# Altium PCB PCB_Button_Board_v2.0.PcbDoc (part 1 of 2)
Units mil, origin at the board's own origin, x right, y up, seen from the top; angles counter-clockwise.
Board outline 1338.58 x 1496.06 mil, 2 copper layers (Top Layer, Bottom Layer), stack 61.811 mil thick; 55 components, 38 nets, 175 pads, 83 vias.
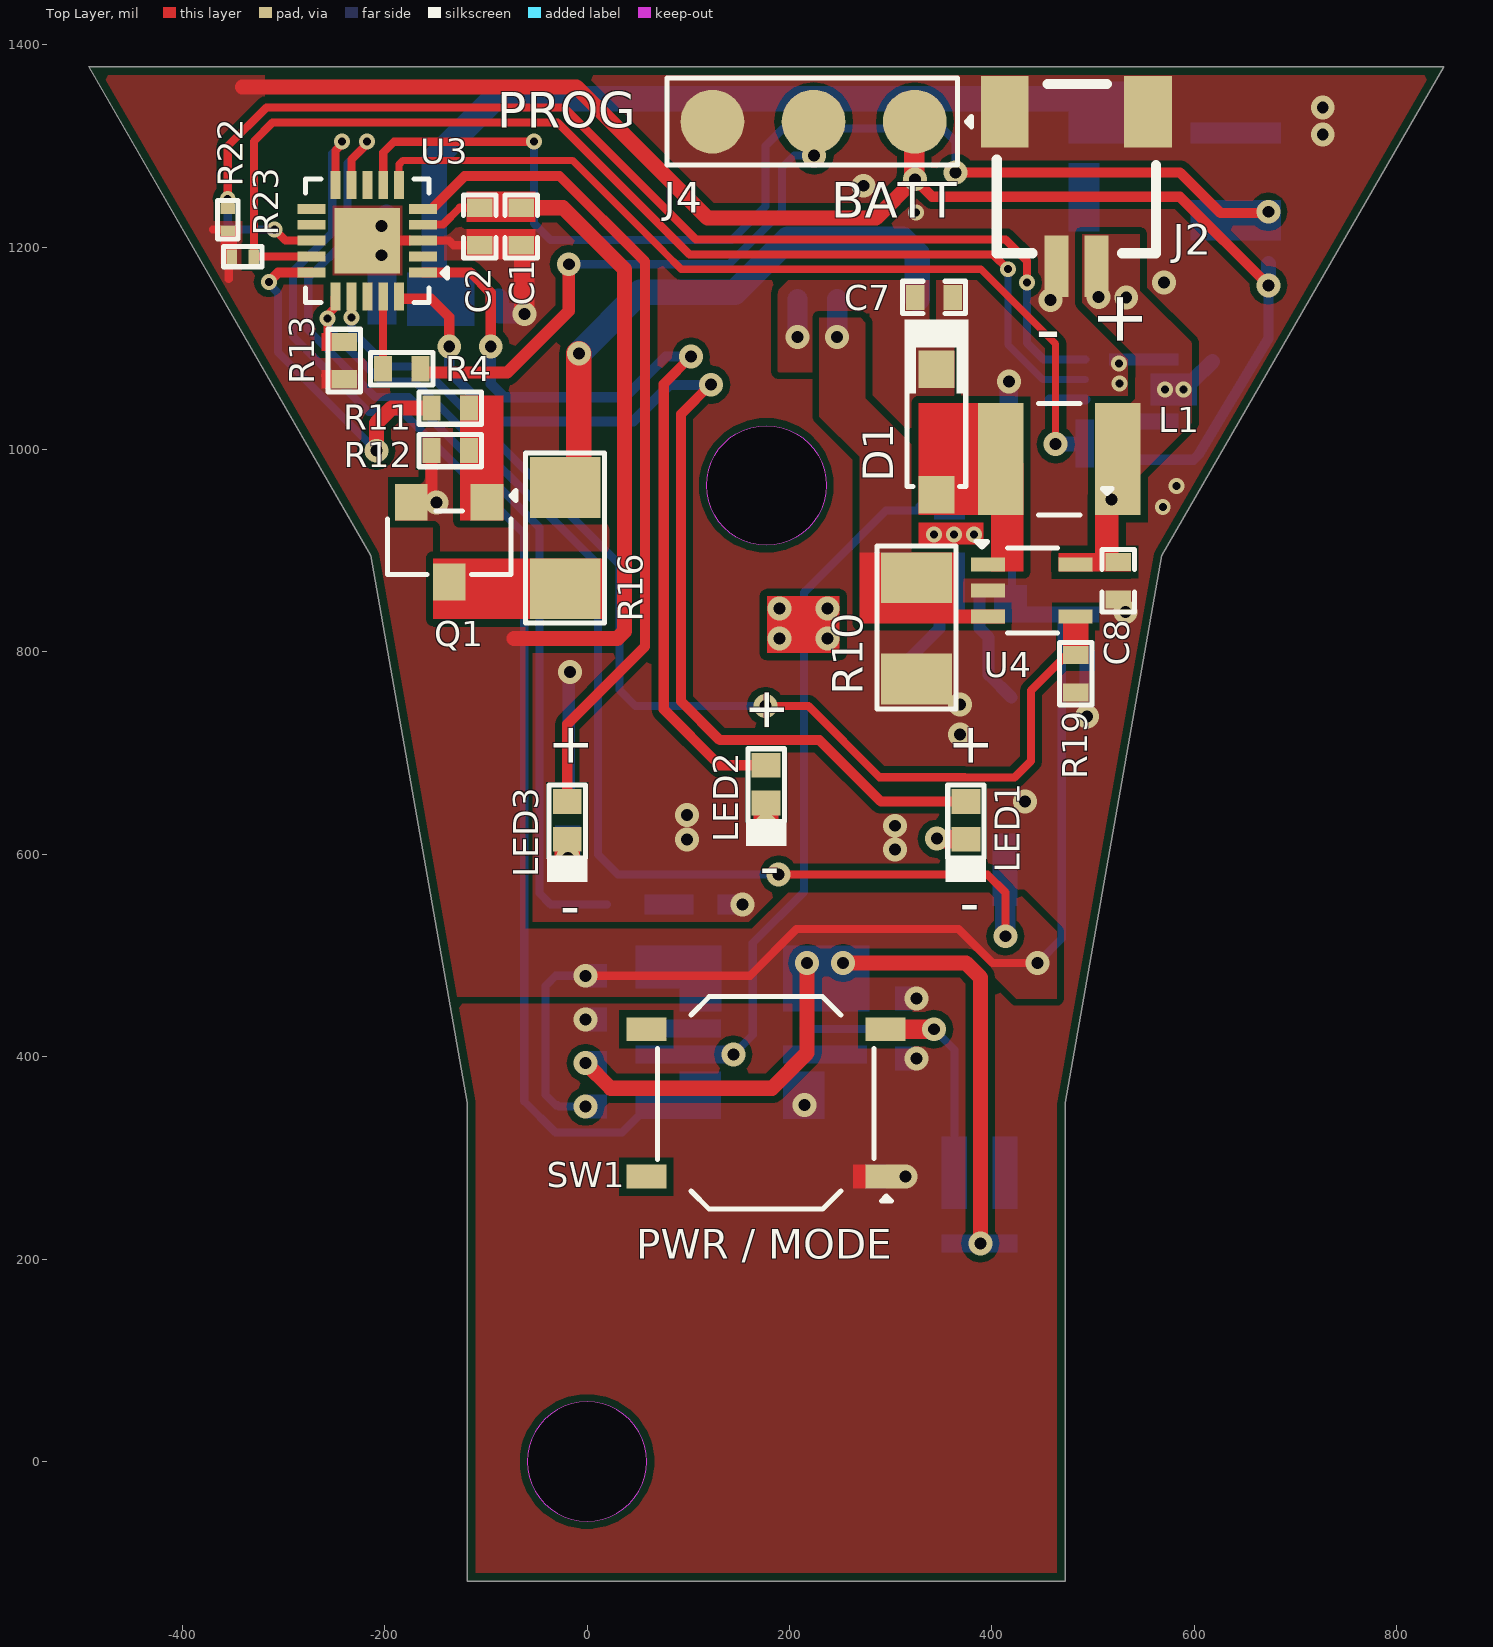
[diagram p0: Top Layer view]
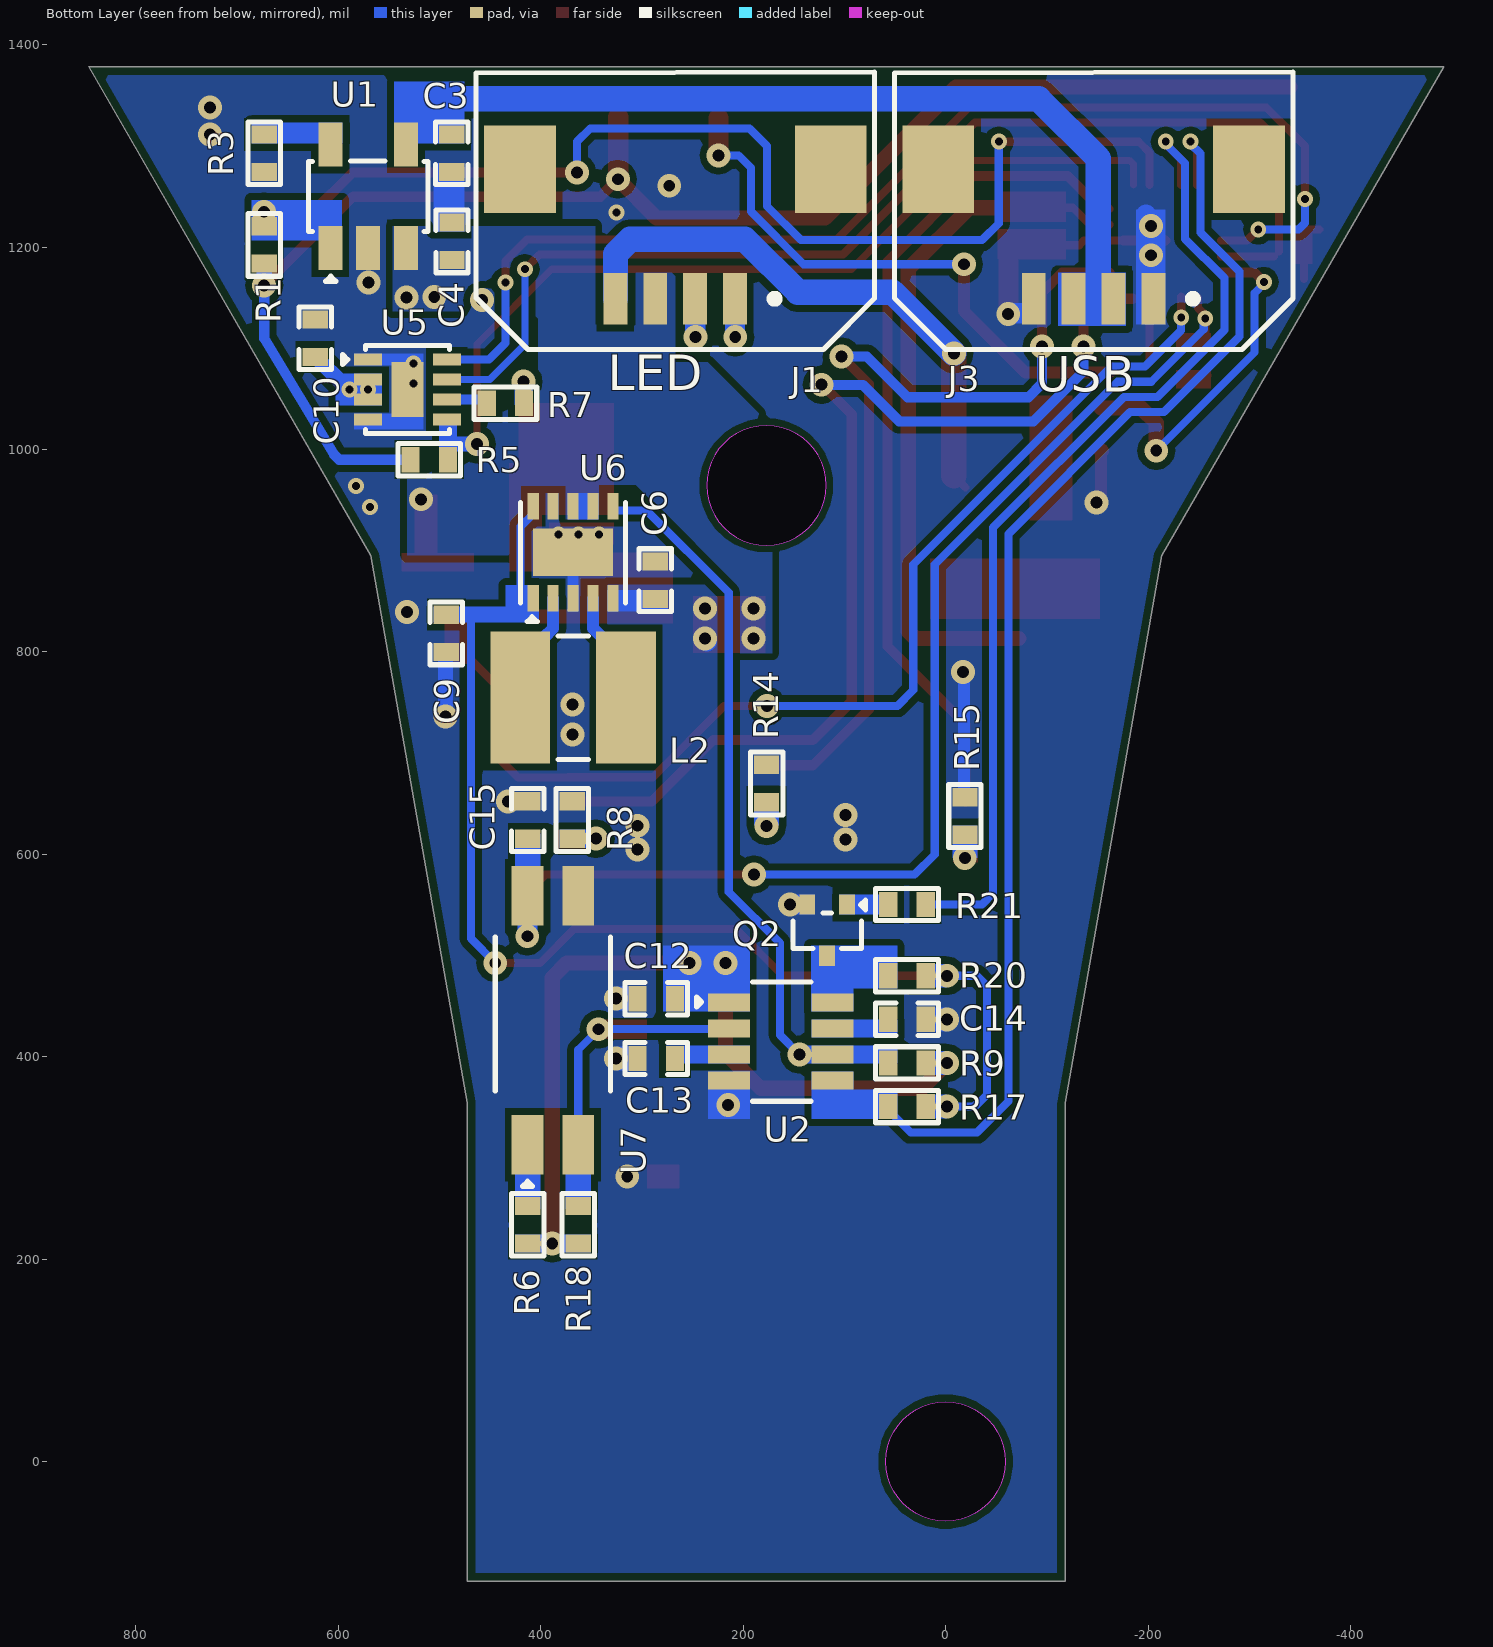
[diagram p1: Bottom Layer view, seen from below]
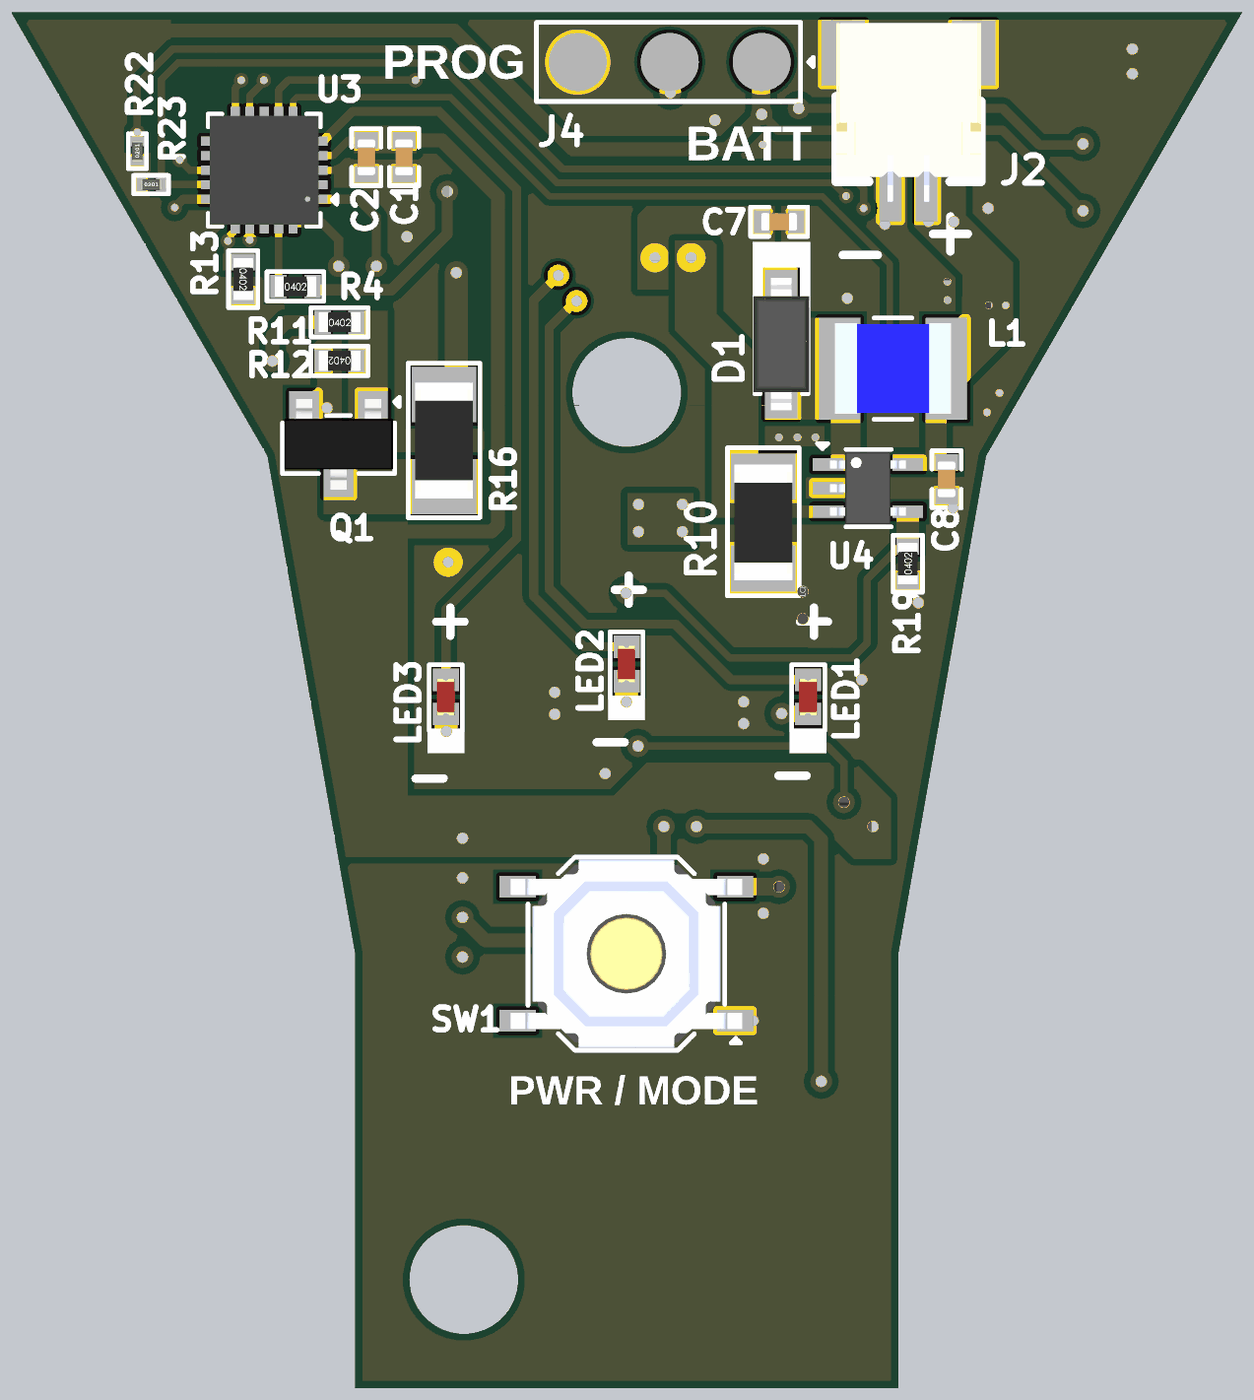
[diagram p2: 3D render of the assembled board from above, using the file's embedded part models]
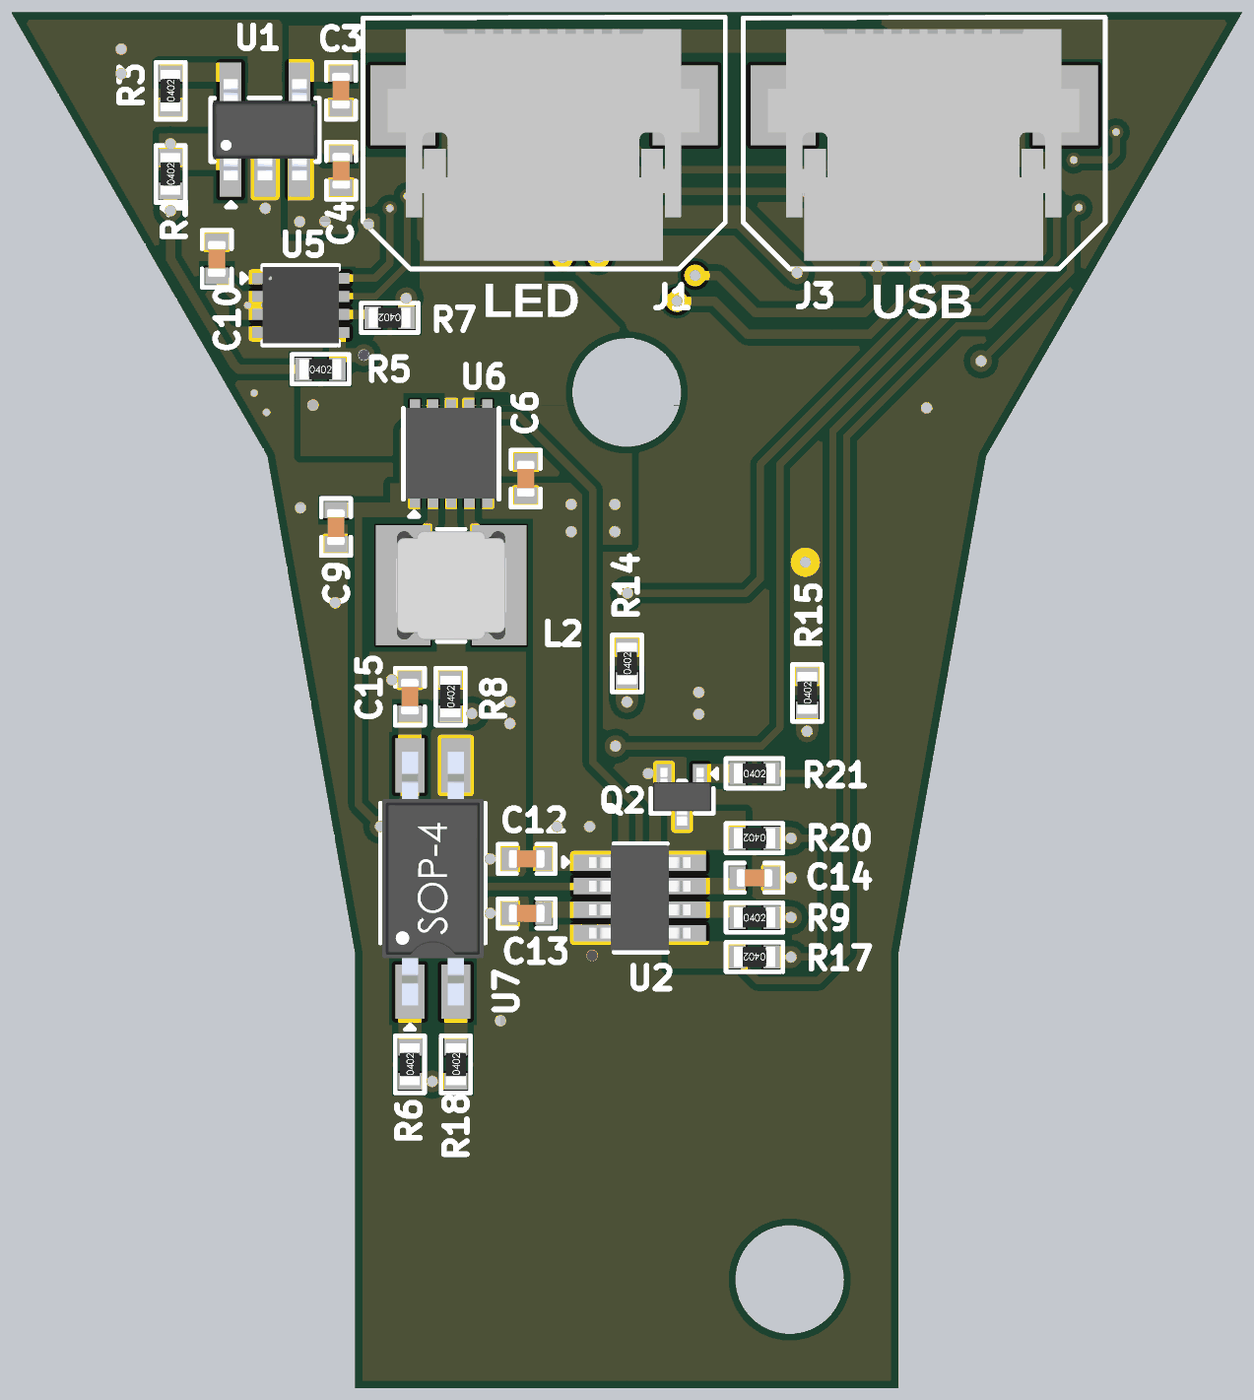
[diagram p3: 3D render of the assembled board from below, using the file's embedded part models]

## Layer stack, top to bottom
Top Solder: solder mask 0.3937, Solder Resist, Dk 3.5
Top Layer: signal copper 1.378
Dielectric 1: core 59.0551, FR-4, Dk 4.8
Bottom Layer: signal copper 1.378
Bottom Solder: solder mask 0.3937, Solder Resist, Dk 3.5

## Board outline
-118.11,-118.11 -118.11,354.33 -213.51,895.38 -492.13,1377.95 846.46,1377.95 567.84,895.38 472.44,354.33 472.44,-118.11
cut-out: -59.06,0 ccw(c0,0) 0,-59.06 ccw(c0,0) 59.06,0 ccw(c0,0) 0,59.06 ccw(c0,0)
cut-out: 177.17,905.51 cw(c177.17,964.57) 118.11,964.57 cw(c177.17,964.57) 177.17,1023.62 cw(c177.17,964.57) 236.22,964.57 cw(c177.17,964.57)

## Design rules (kind name [scope] priority, off if disabled: settings)
BoardOutlineClearance [All] p1: gap=0 ignorepadtopadclearanceinfootprint=FALSE except(8: Poly-OutlineEdge)
Clearance [All] p1: gap=7 ignorepadtopadclearanceinfootprint=FALSE except(4: Arc-SMDPad Track-SMDPad SMDPad-SMDPad; 5: SMDPad-Via)
HoleSize [All] p1: absolutevalues=TRUE maxlimit=1000 minlimit=1 maxpercent=80.000 minpercent=20.000
HoleToHoleClearance [All] p1: gap=2 allowstackedmicrovias=TRUE
MinimumSolderMaskSliver [All] p1: minsoldermaskwidth=0
PolygonConnect [All] p1: connectstyle=Direct reliefconductorwidth=10 reliefentries=4 polygonreliefangle="90 Angle" airgapwidth=10
RoutingVias [All] p1: holewidth=11.81 width=23.62 viastyle="Through Hole" minholewidth=7.87 minwidth=13.78 maxholewidth=11.81 maxwidth=23.62
SilkToSilkClearance [All] p1: silktosilkclearance=0
SilkToSolderMaskClearance [IsPad] p1: minsilkscreentomaskgap=0 clearancetoexposedcopper=TRUE
SolderMaskExpansion [All] p1: expansion=4
Width [All] p1: maxlimit=100 minlimit=7 preferedwidth=12 minimp=50.000000 maximp=50.000000 favimp=50.000000
25 further rules are at their usual default settings.

## Classes and differential pairs
component class U_Power-Sheet: C3 C4 C6 C9 C10 C12 C13 C14 L2 Q2 R1 R3 R5 R7 R9 R17 R20 R21 SW1 U1 U2 U5 U6
component class U_LED-Driver-Sheet: C7 C8 D1 L1 Q1 R10 R11 R12 R16 R19 U4
component class U_Controller-Sheet: C1 C2 C15 J4 LED1 LED2 LED3 R4 R6 R8 R13 R14 R15 R18 R22 R23 U3 U7
component class U_Connector-Sheet: J1 J2 J3

## Components (designator, comment, footprint, x,y, rotation, side; value= is the part's Value field where it differs from the comment)
C1 "1uF" Cap-0402 -64.97,1220.29 r90 top locked
C2 "0.1uF" Cap-0402 -105.97,1220.29 r90 top locked
C3 "4.7uF" Cap-0402 488.01,1292.66 r90 bottom
C4 "10uF" Cap-0402 487.73,1205.63 r270 bottom
C6 "10uF" Cap-0402 287.03,870.88 r90 bottom
C7 "4.7uF" Cap-0402 342.91,1150.23 r180 top
C8 "10uF" Cap-0402 525,870.2 r90 top
C9 "10uF" Cap-0402 493.37,818.26 r270 bottom
C10 "1uF" Cap-0402 622.98,1109.89 r270 bottom
C12 "1uF" Cap-0402 286,457.39 r180 bottom
C13 "680nF" Cap-0402 286,398.2 r180 bottom
C14 "680nF" Cap-0402 38.22,436.9 r0 bottom
C15 "0.1uF" Cap-0402 413,633.89 r270 bottom value=100nF
D1 "1N5819HW-7-F" SOD-123 345.26,1017.22 r90 top
J1 "XF3M(1)-0415-1B" XF3M(1)-0415-1B 267.07,1276.84 r0 bottom locked
J2 "SM02B-SRSS-TB(LF)(SN)" SM02B-SRSS-TB(LF)(SN) 483.58,1258.89 r180 top
J3 "XF3M(1)-0415-1B" XF3M(1)-0415-1B -146.3,1276.84 r0 bottom locked
J4 "3 Pin POGO" "3 Pin POGO" 223.89,1323.89 r180 top
L1 "4.7uH" IND-1210_ 466.71,990.47 r180 top
L2 "1.5uH" LVT303012-1R5M-N 368.11,754.83 r180 bottom
LED1 "XZVG68W-2" LED-0402 374.43,633.54 r270 top
LED2 "XZVG68W-2" LED-0402 176.95,669.29 r270 top
LED3 "XZVG68W-2" LED-0402 -19.57,633.54 r270 top
Q1 "FDN335N" SOT-23 -136.2,908.38 r180 top
Q2 "MMBT3904T-7-F" SOT-523 117,525 r0 bottom
R1 "10K" Res-0402 673.3,1202.13 r90 bottom
R3 "10K" Res-0402 673.3,1292.66 r90 bottom
R4 "4.7K" Res-0402 -183.11,1079.89 r0 top locked
R5 "10K" Res-0402 510.22,989.87 r180 bottom
R6 "470R" Res-0402 413,234 r90 bottom
R7 "10K" Res-0402 434.97,1045.79 r0 bottom
R8 "100R" Res-0402 368.89,633.89 r90 bottom
R9 "10K" Res-0402 38.22,393.8 r180 bottom
R10 "200mR" Res-1206#1 325.66,823.2 r90 top
R11 "1K" Res-0402 -135.11,1040.89 r0 top locked
R12 "10K" Res-0402 -135.11,998.89 r180 top locked
R13 "10K" Res-0402 -239.92,1087.78 r270 top
R14 "100R" Res-0402 176.89,669.89 r90 bottom locked
R15 "100R" Res-0402 -19.11,637.89 r90 bottom locked
R16 "5.6Ω" Res-1206#2 -21.57,912.37 r90 top
R17 "10K" Res-0402 38.22,350.76 r0 bottom
R18 "NC" Res-0402 363,234 r90 bottom
R19 "10K" Res-0402 482.79,778.43 r90 top
R20 "10K" Res-0402 38.22,480 r0 bottom
R21 "1K" Res-0402 38.22,550.39 r180 bottom
R22 "4.7K" Res-0201 -355,1226.96 r90 top
R23 "4.7K" Res-0201 -340.15,1190.54 r0 top
SW1 "TC-0522C-1.7-260G" TC-0522C-1.7-260G_ 176.77,354.29 r180 top value=-
U1 "TP4054" SOT-23-5 570.55,1250.18 r90 bottom
U2 "LTC2950CTS8-1#TRPBF" TSOT-23-8 163,415 r180 bottom
U3 "ATTINY1616-MNR" "20-VQFN (3x3)" -217.09,1206.29 r180 top locked
U4 "TPS92360DCKR" SC70-5 439.48,860.59 r0 top
U5 "MAX17048G+T10" "8-TDFN-EP (2x2)" 531.69,1059.25 r180 bottom
U6 "TPS63031DSKR" SON-10-EP(2.5x2.5) 368.11,898.37 r90 bottom
U7 "TCMT1107" "SOP-4-1.27mm pitch Body 2.6mm" 388,436 r90 bottom

## Footprints (in the part's own frame and the unit in brackets; to place one, negate y for a bottom-side part, rotate by r counter-clockwise, add the part's x,y. Pads: shape width x height; smd on the part's side, far side on the other; paste and mask are expansions set on the pad)
"3 Pin POGO" [mm] "Connector; Header; 3 Position"
  round 1.6 smd: 1(-2.54,0) 2(0,0) 3(2.54,0)
  silkscreen extent -3.96,-1.09 3.68,1.09
"8-TDFN-EP (2x2)" [mm]
  rect 0.7x0.3 smd: 1(-0.99,0.75) 2(-0.99,0.25) 3(-0.99,-0.25) 4(-0.99,-0.75) 5(0.99,-0.75) 6(0.99,-0.25) 7(0.99,0.25) 8(0.99,0.75)
  rect 0.8x1.38 smd: 9(0,0)
  silkscreen extent -1.63,-1.1 1.05,1.1, body extent -1.05,-1.05 1.05,1.05, height 0.81
"20-VQFN (3x3)" [mm]
  rect 0.7x0.25 smd: 1(-1.4,0.8) 2(-1.4,0.4) 3(-1.4,0) 4(-1.4,-0.4) 5(-1.4,-0.8) 11(1.4,-0.8) 12(1.4,-0.4) 13(1.4,0) 14(1.4,0.4) 15(1.4,0.8)
  rect 0.25x0.7 smd: 6(-0.8,-1.4) 7(-0.4,-1.4) 8(0,-1.4) 9(0.4,-1.4) 10(0.8,-1.4) 16(0.8,1.4) 17(0.4,1.4) 18(0,1.4) 19(-0.4,1.4) 20(-0.8,1.4)
  rect 1.65x1.65 smd: 21(0,0)
  silkscreen extent -2.01,-1.55 1.55,1.55, body extent -1.5,-1.5 1.5,1.5, height 0.59
Cap-0402 [mil]
  rect 18x25 smd mask+2.36: 1(-18.5,0) 2(18.5,0)
  silkscreen extent -31,-16 31,16, body extent -20,-10 20,10, height 19
IND-1210_ [mil]
  rect 45x110.63 smd: 1(-57.91,0) 2(57.91,0)
  silkscreen extent -20,-55 20,55, body extent -63,-49 63,49, height 47
LED-0402 [mm]
  rect 0.62x0.72 smd: 1(-0.475,0) 2(0.475,0)
  silkscreen extent -0.89,-0.51 1.55,0.51, body extent -0.5,-0.25 0.51,0.25, height 0.45
LVT303012-1R5M-N [mm]
  rect 1.5x3.32 smd paste+0 mask+0.051: 1(1.328,0) 2(-1.328,0)
  silkscreen extent -0.38,-1.55 0.38,1.55, body extent -1.51,-1.5 1.51,1.5, height 1.51
Res-0201 [mm]
  rect 0.27x0.37 smd mask+0.055: 1(-0.275,0) 2(0.275,0)
  silkscreen extent -0.48,-0.25 0.48,0.25, body extent -0.3,-0.15 0.3,0.15, height 0.29
Res-0402 [mil]
  rect 18x25 smd mask+2.17: 1(-18.5,0) 2(18.5,0)
  silkscreen extent -32,-17 32,16, body extent -23,-11 23,11, height 16
Res-1206#1 [mil]
  rect 50x70 smd: 1(-50,0) 2(50,0)
  silkscreen extent -80,-39 81,39, body extent -63,-31 63,31, height 24
Res-1206#2 [mil]
  rect 60x70 smd: 1(-50,0) 2(50,0)
  silkscreen extent -84,-39 84,39, body extent -63,-31 63,31, height 24
SC70-5 [mm]
  rect 0.85x0.35 smd: 1(-1.1,0.65) 2(-1.1,0) 3(-1.1,-0.65) 4(1.1,-0.65) 5(1.1,0.65)
  silkscreen extent -0.61,-1.07 0.64,1.07, body extent -1.05,-1 1.05,1, height 1.1
SM02B-SRSS-TB(LF)(SN) [mm]
  rect 0.6x1.55 smd: 1(-0.5,1.975) 2(0.5,1.975)
  rect 1.2x1.8 smd: 3(-1.8,-1.9) 4(1.8,-1.9)
  silkscreen extent -2,-2.6 2,1.65, body extent -2,-2.73 2,2.22, height 2.91
SOD-123 [mm]
  rect 0.95x0.9 smd: 1(-1.575,0) 2(1.575,0)
  silkscreen extent -1.37,-0.8 2.82,0.8, body extent -1.82,-0.78 1.83,0.78, height 1.5
SON-10-EP(2.5x2.5) [mm]
  rect 0.665x0.28 smd paste+0 mask+0.051: 1(-1.157,1) 2(-1.157,0.5) 3(-1.157,0) 4(-1.157,-0.5) 5(-1.157,-1) 6(1.157,-1) 7(1.157,-0.5) 8(1.157,0) 9(1.157,0.5) 10(1.157,1)
  rect 1.2x2 smd paste+0 mask+0.051: 11(0,0)
  silkscreen extent -1.74,-1.32 1.24,1.32, body extent -1.25,-1.25 1.25,1.25, height 0.8
"SOP-4-1.27mm pitch Body 2.6mm" [mm]
  rect 1.5x0.8 smd: 1(-3.125,0.635) 2(-3.125,-0.635) 3(3.125,-0.635) 4(3.125,0.635) 4(3.125,0.635)
  silkscreen extent -4.17,-1.45 2.08,1.45, body extent -3.5,-1.4 3.5,1.4, height 2.1
SOT-23 [mm] "TRANS NPN 40V 0.6A SOT23"
  rect 0.82x0.92 smd: 1(-0.95,-1) 2(0.95,-1) 3(0,1)
  silkscreen extent -1.68,-1.3 1.55,0.81, body extent -1.5,-1.25 1.5,1.25, height 1.05
SOT-23-5 [mm]
  rect 1.1x0.6 smd: 1(-1.3,0.95) 2(-1.3,0) 3(-1.3,-0.95) 4(1.3,-0.95) 5(1.3,0.95)
  silkscreen extent -2.13,-1.5 0.88,1.5, body extent -1.4,-1.45 1.4,1.45, height 1.45
SOT-523 [mm]
  rect 0.4x0.51 smd: 1(-0.5,-0.645) 2(0.5,-0.645) 3(0,0.645)
  silkscreen extent -0.97,-0.76 0.86,0.46, body extent -0.8,-0.8 0.8,0.8, height 0.8
TC-0522C-1.7-260G_ [mm]
  rect 1x0.6 smd: 1(-3,1.85) 2(3,1.85) 3(3,-1.85) 4(-3,-1.85)
  silkscreen extent -3.15,-2.67 2.72,2.67, body extent -3.2,-2.6 3.2,2.6, height 1.7
TSOT-23-8 [mm]
  rect 1.05x0.45 smd: 1(-1.3,0.975) 2(-1.3,0.325) 3(-1.3,-0.325) 4(-1.3,-0.975) 5(1.3,-0.975) 6(1.3,-0.325) 7(1.3,0.325) 8(1.3,0.975)
  silkscreen extent -2.11,-1.5 0.76,1.5, body extent -1.4,-1.45 1.4,1.45, height 1
XF3M(1)-0415-1B [mm]
  rect 0.6x1.3 smd: 1(1.503,3.25) 2(0.503,3.25) 3(-0.497,3.25) 4(-1.497,3.25)
  rect 1.8x2.2 smd: S1(3.9,0) S2(-3.9,0)
  silkscreen extent -5,-2.44 5,4.52, body extent -4.28,-2.1 4.32,4.3, height 1.97

## Part data
C1: library part GRM033R60J105MEA2D, "1 µF ±20% 6.3V Ceramic Capacitor X5R 0201 (0603 Metric)", Digikey Part Number=490-7229-6-ND, Manufacturer="Murata Electronics", Package=0201, ComponentLink1Description="Digikey Link", ComponentLink1URL=https://www.digikey.com/en/products/detail/murata-electronics/GRM033R60J105MEA2D/4213369, Item Type=Capacitor, Manufacturer Part Number=GRM033R60J105MEA2D
C2: library part GRM155R71C104KA88J, "0.1 µF ±10% 16V Ceramic Capacitor X7R 0402 (1005 Metric)", Digikey Part Number=490-6328-6-ND, Manufacturer="Murata Electronics", Package=0402, ComponentLink1Description="Digikey Link", ComponentLink1URL=https://www.digikey.com/en/products/detail/murata-electronics/GRM155R71C104KA88J/2610892, Item Type=Capacitor, Manufacturer Part Number=GRM155R71C104KA88J
C3 C7: library part CL05A475MO5NUNC, "CAP CER 4.7UF 16V X5R 0402", Case Code (Imperial)=0402, Case Code (Metric)=1005, Manufacturer=Samsung, Max Operating Temperature=85°C, Min Operating Temperature=-55°C, Tolerance=20%, Voltage Rating=16V, Capacitance=4.7uF, Case/Package=0402, Category="Ceramic Capacitors", ComponentLink1Description=http://www.farnell.com/datasheets/2710653.pdf?src-supplier=Farnell, ComponentLink1URL=http://www.farnell.com/datasheets/2710653.pdf?src-supplier=Farnell, ComponentLink2Description=http://www.samsungsem.com/kr/support/product-search/mlcc/CL05A475MO5NUNC.jsp?src-supplier=Digikey, ComponentLink2URL=http://www.samsungsem.com/kr/support/product-search/mlcc/CL05A475MO5NUNC.jsp?src-supplier=Digikey, ComponentLink3Description=http://www.farnell.com/datasheets/2710653.pdf?src-supplier=Element14, ComponentLink3URL=http://www.farnell.com/datasheets/2710653.pdf?src-supplier=Element14, ComponentLink4Description=https://datasheet.octopart.com/CL05A475MO5NUNC-Samsung-Electro-Mechanics-datasheet-123102911.pdf?src-supplier=Future+Electronics, ComponentLink4URL=https://datasheet.octopart.com/CL05A475MO5NUNC-Samsung-Electro-Mechanics-datasheet-123102911.pdf?src-supplier=Future+Electronics, ComponentLink5Description=http://www.farnell.com/datasheets/2710653.pdf?src-supplier=Newark, ComponentLink5URL=http://www.farnell.com/datasheets/2710653.pdf?src-supplier=Newark, Height=550um, Length=0.039inch, Manufacturer Part Number=CL05A475MO5NUNC, Material=4241ConductorMaterial, Mount="Surface Mount", Packaging="Cut Tape", Pricing 1="10000=0.09712 (USD)", RoHS=Yes, RoHS Compliant=Yes, Series=CL, Stock 1=50000, Supplier 1=Avnet, Supplier Part Number 1=CL05A475MO5NUNC, Thickness=0.022inch, Voltage Rating (DC)=16V, Width=0.02inch
C4 C6 C8 C9: library part CL05A106MP5NUNC, "CAP CER 10UF 10V X5R 0402", Case Code (Imperial)=0402, Case Code (Metric)=1005, Dielectric=X5R, LCSC Part Number=C315248, Manufacturer=Samsung, Max Operating Temperature=85°C, Min Operating Temperature=-55°C, Package Quantity=1, Tolerance=20%, Voltage Rating=10V, Capacitance=10uF, Case/Package=0402, Category="Ceramic Capacitors", ComponentLink1Description=https://datasheet.ciiva.com/25721/cl05a106mp5nunc-25721584.pdf?src-supplier=Digi-Key, ComponentLink1URL=https://datasheet.ciiva.com/25721/cl05a106mp5nunc-25721584.pdf?src-supplier=Digi-Key, ComponentLink2Description=https://datasheet.ciiva.com/26838/getdatasheetpartid-745310-26838170.pdf?src-supplier=Verical, ComponentLink2URL=https://datasheet.ciiva.com/26838/getdatasheetpartid-745310-26838170.pdf?src-supplier=Verical, Construction=Flat, Contact Plating=Tin, Depth=0.5mm, Item Type=Capacitor, Lead Free="Lead Free", Length=1mm, Manufacturer Part Number=CL05A106MP5NUNC, Mount="Surface Mount", Packaging="Tape and Reel", Pricing 1="10000=0.02537 (USD)", Radiation Hardening=No, RoHS=Yes, RoHS Compliant=Yes, Series=CL, Stock 1=1729850, Supplier 1=Avnet, Supplier Part Number 1=CL05A106MP5NUNC, Termination=Wraparound, Thickness=0.028inch, Width=0.02inch
C10: library part CC0402KRX5R7BB105, "CAP CER 1UF 16V X5R 0402", Case Code (Imperial)=0402, Case Code (Metric)=1005, Dielectric=X5R, LCSC Part Number=C325464, Manufacturer=Yageo, Max Operating Temperature=85°C, Min Operating Temperature=-55°C, Supplier Part Number 1=311-1691-6-ND, Tolerance=10%, Voltage Rating=16V, Capacitance=1uF, Case/Package=0402, ComponentLink1Description=http://www.yageo.com/documents/recent/UPY-GPHC_X5R_4V-to-50V_12.pdf?src-supplier=Avnet+Europe, ComponentLink1URL=http://www.yageo.com/documents/recent/UPY-GPHC_X5R_4V-to-50V_12.pdf?src-supplier=Avnet+Europe, Composition=Ceramic, Depth=0.5mm, Halogen Free="Halogen Free", Height=0.5mm, Item Type=Capacitor, Lead Free="Lead Free", Length=1mm, Manufacturer Part Number=CC0402KRX5R7BB105, Mount="Surface Mount", Packaging="Tape and Reel", Pricing 1="1=0.36, 10=0.252, 100=0.1512, 500=0.1134, 1000=0.09576, 2500=0.09072, 5000=0.08568 (USD)", Radiation Hardening=No, Stock 1=1405667, Supplier 1=Digi-Key, Termination=SMD/SMT, Thickness=0.022inch, Voltage Rating (DC)=16V, Weight=2.3E-05oz, Width=0.02inch
C12: library part GRM155R61E105KA12D, "CAP CER 1UF 25V X5R 0402", Case Code (Imperial)=0402, Case Code (Metric)=1005, Dielectric=X5R, LCSC Part Number=C77009, Manufacturer=Murata, Max Operating Temperature=85°C, Min Operating Temperature=-55°C, Package Quantity=10000, Supplier Part Number 1=490-10017-6-ND, Tolerance=10%, Voltage=25V, Capacitance=1uF, Case/Package=0402, ComponentLink1Description=http://www.farnell.com/datasheets/2048341.pdf?src-supplier=Element14, ComponentLink1URL=http://www.farnell.com/datasheets/2048341.pdf?src-supplier=Element14, Depth=0.5mm, Height=0.5mm, Lead Free="Lead Free", Length=1mm, Manufacturer Part Number=GRM155R61E105KA12D, Material=Ceramic, Mount="Surface Mount", Packaging="Tape and Reel", Pricing 1="1=0.11, 10=0.077, 100=0.0363, 500=0.02546, 1000=0.02108, 2500=0.01962, 5000=0.01795 (USD)", REACH SVHC="No SVHC", Stock 1=1150750, Supplier 1=Digi-Key, Termination=SMD/SMT, Thickness=0.022inch, Voltage Rating=25V, Voltage Rating (DC)=25V, Weight=0.000212oz, Width=0.5mm
C13 C14: library part CC0402KRX5R6BB684, "CAP CER 0.68UF 10V X5R 0402", LCSC Part Number=C113784, Manufacturer=Yageo, Temperature Coefficient=30ppm/°C, ComponentLink1Description=http://www.yageo.com/exep/pages/download/literatures/ProductSelectionGuide%202014_Final_2.pdf?src-supplier=Digikey, ComponentLink1URL=http://www.yageo.com/exep/pages/download/literatures/ProductSelectionGuide%202014_Final_2.pdf?src-supplier=Digikey, ComponentLink2Description=http://www.yageo.com/documents/recent/UPY-GPHC_X5R_4V-to-50V_25.pdf?src-supplier=Digikey, ComponentLink2URL=http://www.yageo.com/documents/recent/UPY-GPHC_X5R_4V-to-50V_25.pdf?src-supplier=Digikey, ComponentLink3Description=https://www.yageo.com/upload/media/product/productsearch/datasheet/mlcc/UPY-GPHC_X5R_4V-to-50V_26.pdf?src-supplier=Digikey, ComponentLink3URL=https://www.yageo.com/upload/media/product/productsearch/datasheet/mlcc/UPY-GPHC_X5R_4V-to-50V_26.pdf?src-supplier=Digikey, ComponentLink4Description=https://datasheet.octopart.com/CC0402KRX5R6BB684-Yageo-datasheet-86397281.pdf?src-supplier=Future+Electronics, ComponentLink4URL=https://datasheet.octopart.com/CC0402KRX5R6BB684-Yageo-datasheet-86397281.pdf?src-supplier=Future+Electronics, Height=550um, Item Type=Capacitor, Manufacturer Part Number=CC0402KRX5R6BB684, Material=4241ConductorMaterial, Pricing="1=0.12, 10=0.079, 50=0.0474, 100=0.0372, 500=0.0275, 1000=0.02277, 2500=0.0212, 5000=0.01939 (USD)", RoHS=Yes, Stock=42168, Supplier=Digikey
C15: library part GRM155R71C104KA88D, "CAP CER 0.1UF 16V X7R 0402", Case Code (Imperial)=0402, Case Code (Metric)=1005, Dielectric=X7R, Dielectric Material=Ceramic, Insulation Resistance=10GR, LCSC Part Number=C71629, Manufacturer=Murata, Max Operating Temperature=125°C, Min Operating Temperature=-55°C, Package Quantity=1, Tolerance=10%, Voltage=16V, Case/Package=0402, Category="Ceramic Capacitors", ComponentLink1Description=https://datasheet.ciiva.com/129/grm155r71c104ka88-01-129739.pdf?src-supplier=Digi-Key, ComponentLink1URL=https://datasheet.ciiva.com/129/grm155r71c104ka88-01-129739.pdf?src-supplier=Digi-Key, ComponentLink2Description=https://datasheet.ciiva.com/129/grm155r71c104ka88-01-129740.pdf?src-supplier=Digi-Key, ComponentLink2URL=https://datasheet.ciiva.com/129/grm155r71c104ka88-01-129740.pdf?src-supplier=Digi-Key, ComponentLink3Description=https://datasheet.ciiva.com/18102/getdatasheetpartid-85307-18102905.pdf?src-supplier=Verical, ComponentLink3URL=https://datasheet.ciiva.com/18102/getdatasheetpartid-85307-18102905.pdf?src-supplier=Verical, ComponentLink4Description=https://datasheet.ciiva.com/29199/454098-da-01-en-vs-kondensator-0402-29199799.pdf?src-supplier=Conrad, ComponentLink4URL=https://datasheet.ciiva.com/29199/454098-da-01-en-vs-kondensator-0402-29199799.pdf?src-supplier=Conrad, ComponentLink5Description=https://datasheet.ciiva.com/7937/4360-7937615.pdf?src-supplier=Element14, ComponentLink5URL=https://datasheet.ciiva.com/7937/4360-7937615.pdf?src-supplier=Element14, ComponentLink6Description=https://datasheet.ciiva.com/14116/grmseries-highdielectrictype-eng-14116878.pdf?src-supplier=Distrelec, ComponentLink6URL=https://datasheet.ciiva.com/14116/grmseries-highdielectrictype-eng-14116878.pdf?src-supplier=Distrelec, ComponentLink7Description=https://datasheet.ciiva.com/14103/grmseries-highdielectrictype-eng-14103750.pdf?src-supplier=Distrelec, ComponentLink7URL=https://datasheet.ciiva.com/14103/grmseries-highdielectrictype-eng-14103750.pdf?src-supplier=Distrelec, ComponentLink8Description=https://datasheet.ciiva.com/28534/4360-28534127.pdf?src-supplier=Element14, ComponentLink8URL=https://datasheet.ciiva.com/28534/4360-28534127.pdf?src-supplier=Element14, ComponentLink9Description=https://datasheet.ciiva.com/28534/4360-28534133.pdf?src-supplier=Element14, ComponentLink9URL=https://datasheet.ciiva.com/28534/4360-28534133.pdf?src-supplier=Element14, ComponentLink10Description=https://datasheet.ciiva.com/16199/product-16199000.pdf?src-supplier=Future+Electronics, ComponentLink10URL=https://datasheet.ciiva.com/16199/product-16199000.pdf?src-supplier=Future+Electronics, Depth=0.5mm, Height=0.5mm, Item Type=Capacitor, Lead Free="Lead Free", Length=1mm, Manufacturer Part Number=GRM155R71C104KA88D, Material=Ceramic, Mounting Technology="Surface Mount", Packaging="Tape and Reel", Pins=2, Pricing 1="10000=0.00480, 30000=0.00470, 100000=0.00350, 250000=0.00330 (USD)", Radiation Hardening=No, RoHS=Yes, RoHS Compliant=Yes, Series=GRM, Stock 1=1690322, Supplier 1="Arrow Electronics", Supplier Part Number 1=GRM155R71C104KA88D, Termination=SMD/SMT, Thickness=0.022inch, Voltage Rating=16V, Voltage Rating (DC)=16V, Width=0.02inch
D1: "DIODE SCHOTTKY 40V 1A SOD123", Average Rectified Current=1A, Capacitance=110pF, Case/Package=SOD-123-2, Forward Voltage=450mV, LCSC Part Number=C82544, Manufacturer=Diodes, Max Forward Surge Current (Ifsm)=25A, Max Operating Temperature=125°C, Max Power Dissipation=450mW, Max Repetitive Reverse Voltage (Vrrm)=40V, Max Reverse Current=50uA, Min Operating Temperature=-65°C, Package Quantity=3000, Supplier Part Number 1=1N5819HW-FDICT-ND, Category="Schottky Diodes", ComponentLink1Description=https://datasheet.ciiva.com/16303/ds30217-16303296.pdf?src-supplier=Future+Electronics, ComponentLink1URL=https://datasheet.ciiva.com/16303/ds30217-16303296.pdf?src-supplier=Future+Electronics, ComponentLink2Description=https://datasheet.ciiva.com/27092/1538419-27092484.pdf?src-supplier=Jameco, ComponentLink2URL=https://datasheet.ciiva.com/27092/1538419-27092484.pdf?src-supplier=Jameco, ComponentLink3Description=https://datasheet.ciiva.com/912/ds30217-912801.pdf?src-supplier=Digi-Key, ComponentLink3URL=https://datasheet.ciiva.com/912/ds30217-912801.pdf?src-supplier=Digi-Key, ComponentLink4Description=https://datasheet.ciiva.com/1177/ds30217-1177089.pdf?src-supplier=Element14, ComponentLink4URL=https://datasheet.ciiva.com/1177/ds30217-1177089.pdf?src-supplier=Element14, ComponentLink5Description=https://datasheet.ciiva.com/912/ds30217-912802.pdf?src-supplier=Digi-Key, ComponentLink5URL=https://datasheet.ciiva.com/912/ds30217-912802.pdf?src-supplier=Digi-Key, ComponentLink6Description=https://datasheet.ciiva.com/912/ds30217-912803.pdf?src-supplier=Digi-Key, ComponentLink6URL=https://datasheet.ciiva.com/912/ds30217-912803.pdf?src-supplier=Digi-Key, ComponentLink7Description=https://datasheet.ciiva.com/8303/ds30217-8303132.pdf?src-supplier=Avnet, ComponentLink7URL=https://datasheet.ciiva.com/8303/ds30217-8303132.pdf?src-supplier=Avnet, ComponentLink8Description=https://datasheet.ciiva.com/25919/ds30217-25919644.pdf?src-supplier=Avnet+Europe, ComponentLink8URL=https://datasheet.ciiva.com/25919/ds30217-25919644.pdf?src-supplier=Avnet+Europe, Contact Plating=Tin,Matte, Current Rating=1A, Element Configuration=Single, Forward Current=1A, Height=1.25mm, Item Type=Diode, Lead Free="Lead Free", Length=2.85mm, Manufacturer Part Number=1N5819HW-7-F, Max Reverse Voltage (DC)=40V, Number of Pins=2, Output Current=1A, Packaging="Tape and Reel", Peak Non-Repetitive Surge Current=25A, Polarity=Standard, Pricing 1="1=0.46000, 10=0.34500, 100=0.19530, 500=0.12936, 1000=0.09918 (USD)", Radiation Hardening=No, REACH SVHC="No SVHC", RoHS=Yes, RoHS Compliant=Yes, Series=-, Supplier 1=Digi-Key, Termination=SMD/SMT, Voltage Rating (DC)=40V, Weight=0.000353oz, Width=1.7mm
J1 J3: "4 Position FFC, FPC Connector Contacts, Top and Bottom 0.039\" (1.00mm) Surface Mount, Right Angle", Digikey Part Number=OR1210CT-ND, Manufacturer="Omron Electronics Inc-EMC Div", Package="1mm FPC", ComponentLink1Description="Digikey Link", ComponentLink1URL=https://www.digikey.com/en/products/detail/omron-electronics-inc-emc-div/XF3M-1-0415-1B/4695932, Item Type=FPC-1mm, Manufacturer Part Number=XF3M(1)-0415-1B
J2: "Connector Header Surface Mount, Right Angle 2 position 0.039 _1.00mm_", Digikey Part Number=455-SM02B-SRSS-TBDKR-ND, Manufacturer="JST Sales", Manufacturer Part Number=SM02B-SRSS-TB_LF__SN_, Package=None, Availability=Unavailable, ComponentLink1Description="Digikey Link", ComponentLink1URL=https://www.digikey.com/en/products/detail/jst-sales-america-inc/SM02B-SRSS-TB/926708?s=N4IgTCBcDaIMoFkAMYBCBaOAlOd0BVUQBdAXyA, Price=None, SnapEDA_Link=https://www.snapeda.com/parts/SM02B-SRSS-TB%28LF%29%28SN%29/JST%20Sales%20America%20Inc./view-part/447499/?ref=snap
J4: library part 68000-103HLF, "CONN HEADER VERT 3POS 2.54MM", Current Rating=3A, Digikey Part Number=609-3461-ND, Flammability Rating="UL94 V-0", Housing Color=Black, Insulation Resistance=5GR, LCSC Part Number=C168677, Max Operating Temperature=125°C, Max Voltage Rating (AC)=1.5kV, Min Operating Temperature=-65°C, Package Quantity=100, Supplier Part Number=88K1775, Category="Headers and Wire Housings", ComponentLink1Description=LCSC, ComponentLink2Description=https://datasheet.ciiva.com/46392/1914865-46392021.pdf?src-supplier=Element14, ComponentLink2URL=https://datasheet.ciiva.com/46392/1914865-46392021.pdf?src-supplier=Element14, ComponentLink3Description="Digikey Link", ComponentLink3URL=https://www.digikey.com/en/products/detail/amphenol-cs-fci/68000-103HLF/2023309?s=N4IgTCBcDaIGwA4AMKC0BGJBmAEgGQDEQBdAXyA, Contact Gender=Male, Contact Material=Bronze, Contact Mating Length=5.84mm, Contact Plating=Gold,GXT, Contact Post Length=2.41mm, Depth=2.41mm, Housing Material=Thermoplastic, Item Type="Male Header", Length=7.62mm, Manufacturer Part Number=68000-103HLF, Number of Contacts=3, Number of Positions=3, Number of Rows=1, Orientation=Straight, Packaging=Bulk, Pitch=2.54mm, Pricing="1=0.395, 10=0.31, 25=0.29, 50=0.27, 100=0.25 (USD)", Radiation Hardening=No, Reach SVHC Compliant=No, RoHS=No, Series=68000, Stock=2805, Supplier=Avnet, Termination="Through Hole", Voltage Rating=1.5kV
L1: library part DFE322512F-4R7M=P2, "FIXED IND 4.7UH 1.6A 157MOHM SMD", LCSC Part Number=C703083, Manufacturer=Murata, Manufacturer Part Number=DFE322512F-4R7M=P2, Supplier Part Number 1=490-DFE322512F-4R7M=P2CT-ND, Category="Fixed Inductors", Item Type=Inductor, Pricing 1="1=0.61, 10=0.533, 25=0.4952, 50=0.4188, 100=0.3808, 250=0.35792, 500=0.31984, 1000=0.25892 (USD)", RoHS=Yes, RoHS Compliant=Yes, Stock 1=4687, Supplier 1=Digi-Key
L2: library part LVT303012-1R5M-N, "2.34A 1.5uH Shielded Power Inductors ±20% SMD Power Inductors ROHS", LCSC Part Number=C280560, Manufacturer="Chilisin Elec", Package=SMD, ComponentLink1Description=LCSC, ComponentLink1URL=https://www.lcsc.com/product-detail/Power-Inductors_Chilisin-Elec-LVT303012-1R5M-N_C280560.html, Item Type=Inductor, Manufacturer Part Number=LVT303012-1R5M-N
LED1 LED2 LED3: "LED GREEN CLEAR CHIP SMD", Case Code (Imperial)=0402, Case Code (Metric)=1005, Color=Green, Forward Voltage=2.1V, Lens Color=Colorless, Manufacturer=SunLED, Supplier Part Number 1=1497-1219-6-ND, Test Current=20mA, Case/Package=0402, ComponentLink1Description=http://www.sunledusa.com/products/spec/XZVG68W-2.pdf?src-supplier=Digi-Key, ComponentLink1URL=http://www.sunledusa.com/products/spec/XZVG68W-2.pdf?src-supplier=Digi-Key, ComponentLink2Description=https://www.sunledusa.com/products/spec/XZVG68W-2.pdf?src-supplier=Digi-Key, ComponentLink2URL=https://www.sunledusa.com/products/spec/XZVG68W-2.pdf?src-supplier=Digi-Key, Dominant Wavelength=570nm, Height=0.6mm, Item Type=LED, Length=1mm, Lens Transparency=Clear, Luminous Intensity=49mcd, Manufacturer Part Number=XZVG68W-2, Mount="Surface Mount", Packaging="Tape and Reel", Pricing 1="1=0.5, 10=0.36, 100=0.16, 500=0.112, 1000=0.092 (USD)", Stock 1=4185, Supplier 1=Digi-Key, Viewing Angle=120°, Width=0.5mm
Q1: "SOT-23 MOSFETs ROHS", Digikey Part Number=FDN335NDKR-ND, Manufacturer=onsemi, Package=SOT-23, ComponentLink1Description="Digikey Link", ComponentLink1URL=https://www.digikey.com/en/products/detail/onsemi/FDN335N/965301, Item Type=Mosfet, Manufacturer Part Number=FDN335N
Q2: "TRANS NPN 40V 0.2A SOT523", LCSC Part Number=C239187, Manufacturer="Diodes Zetex", Supplier Part Number=4140292, Category=BJTs, ComponentLink1Description=https://datasheet.ciiva.com/15139/getdatasheetpartid-142850-15139485.pdf?src-supplier=Verical, ComponentLink1URL=https://datasheet.ciiva.com/15139/getdatasheetpartid-142850-15139485.pdf?src-supplier=Verical, ComponentLink2Description=https://datasheet.ciiva.com/11199/ds30270-11199009.pdf?src-supplier=Avnet, ComponentLink2URL=https://datasheet.ciiva.com/11199/ds30270-11199009.pdf?src-supplier=Avnet, ComponentLink3Description=https://datasheet.ciiva.com/17053/0900766b80e49818-17053736.pdf?src-supplier=Allied+Electronics, ComponentLink3URL=https://datasheet.ciiva.com/17053/0900766b80e49818-17053736.pdf?src-supplier=Allied+Electronics, ComponentLink4Description=https://datasheet.ciiva.com/8029/ds30270-8029717.pdf?src-supplier=Element14, ComponentLink4URL=https://datasheet.ciiva.com/8029/ds30270-8029717.pdf?src-supplier=Element14, ComponentLink5Description=https://datasheet.ciiva.com/22711/480146-22711751.pdf?src-supplier=Element14, ComponentLink5URL=https://datasheet.ciiva.com/22711/480146-22711751.pdf?src-supplier=Element14, ComponentLink6Description=https://datasheet.ciiva.com/4723/ds30270-4723401.pdf?src-supplier=Mouser, ComponentLink6URL=https://datasheet.ciiva.com/4723/ds30270-4723401.pdf?src-supplier=Mouser, ComponentLink7Description=https://datasheet.ciiva.com/6360/ds30270-6360919.pdf?src-supplier=Digikey, ComponentLink7URL=https://datasheet.ciiva.com/6360/ds30270-6360919.pdf?src-supplier=Digikey, Item Type=Transistor, Manufacturer Part Number=MMBT3904T-7-F, Pricing="3000=0.0261, 9000=0.0252, 15000=0.0248, 60000=0.0236, 90000=0.0229 (USD)", RoHS=Yes, Stock=36000, Supplier="Future Electronics"
R1 R12: library part RC0603FR-0710KL, "10 kOhms ±1% 0.063W, 1/16W Chip Resistor 0402 (1005 Metric) Moisture Resistant Thick Film", Digikey Part Number=311-10.0KLRDKR-ND, Manufacturer=YAGEO, Manufacturer Part Number=RC0402FR-0710KL, Package=0402, ComponentLink1Description="Digikey Link", ComponentLink1URL=https://www.digikey.com/en/products/detail/yageo/RC0402FR-0710KL/726523, Item Type=Resistor
R3 R5 R7 R9 R13 R17 R20: library part RC0402FR-0710KL, "RES 10K OHM 1% 1/16W 0402", Case Code (Imperial)=0402, Case Code (Metric)=1005, LCSC Part Number=C60490, Manufacturer=Yageo, Max Operating Temperature=155°C, Max Power Dissipation=63mW, Min Operating Temperature=-55°C, Power Rating=62.5mW, Resistance=10kR, Resistance Tolerance=1%, Resistor Type="Thick Film", Supplier Part Number 1=603-RC0402FR-0710KL, Temperature Coefficient=100ppm/°C, Voltage Rating=50V, Case/Package=0402, Category="Chip SMD Resistors", ComponentLink1Description=https://datasheet.ciiva.com/7660/38568-7660787.pdf?src-supplier=Element14, ComponentLink1URL=https://datasheet.ciiva.com/7660/38568-7660787.pdf?src-supplier=Element14, ComponentLink2Description=https://datasheet.ciiva.com/7849/1686128-7849814.pdf?src-supplier=Element14, ComponentLink2URL=https://datasheet.ciiva.com/7849/1686128-7849814.pdf?src-supplier=Element14, ComponentLink3Description=https://datasheet.ciiva.com/7983/1018594-7983486.pdf?src-supplier=Element14, ComponentLink3URL=https://datasheet.ciiva.com/7983/1018594-7983486.pdf?src-supplier=Element14, ComponentLink4Description=https://datasheet.ciiva.com/22747/1018594-22747512.pdf?src-supplier=Element14, ComponentLink4URL=https://datasheet.ciiva.com/22747/1018594-22747512.pdf?src-supplier=Element14, ComponentLink5Description=https://datasheet.ciiva.com/12667/pyu-rc0402-51-rohs-l-6-r-12667067.pdf?src-supplier=Mouser, ComponentLink5URL=https://datasheet.ciiva.com/12667/pyu-rc0402-51-rohs-l-6-r-12667067.pdf?src-supplier=Mouser, ComponentLink6Description=https://datasheet.ciiva.com/7849/1784430-7849813.pdf?src-supplier=Element14, ComponentLink6URL=https://datasheet.ciiva.com/7849/1784430-7849813.pdf?src-supplier=Element14, ComponentLink7Description=https://datasheet.ciiva.com/7849/1784430-7849815.pdf?src-supplier=Element14, ComponentLink7URL=https://datasheet.ciiva.com/7849/1784430-7849815.pdf?src-supplier=Element14, Construction=Rectangular, Depth=0.5mm, Features="Moisture Resistant", Height=0.32mm, Item Type=Resistor, Lead Free="Lead Free", Lead Pitch=0.2mm, Length=1mm, Manufacturer Part Number=RC0402FR-0710KL, Military Standard=Not, Number of Pins=2, Number of Terminations=2, Packaging="Tape and Reel", Pricing 1="1=0.10000, 10=0.01400, 50=0.01400, 100=0.00500, 1000=0.00300, 10000=0.00200 (USD)", REACH SVHC="No SVHC", RoHS=Yes, RoHS Compliant=Yes, Series=RC, Stock 1=18648329, Supplier 1=Mouser, Termination=SMD/SMT, Tolerance=1%, Voltage Rating (DC)=50V, Width=0.5mm, Working Voltage=50V
R4: library part RC0402FR-074K7L, "4.7 kOhms ±1% 0.063W, 1/16W Chip Resistor 0402 (1005 Metric) Moisture Resistant Thick Film", Digikey Part Number=311-4.7KLRDKR-ND, Manufacturer=YAGEO, Package=0402, ComponentLink1Description="Digikey Link", ComponentLink1URL=https://www.digikey.com/en/products/detail/yageo/RC0402FR-074K7L/2827563, Item Type=Resistor, Manufacturer Part Number=RC0402FR-074K7L
R6: library part RC0402FR-07470RL, "RES 470 OHM 1% 1/16W 0402", Case Code (Imperial)=0402, Case Code (Metric)=1005, LCSC Part Number=C114877, Manufacturer=Yageo, Max Operating Temperature=155°C, Max Power Dissipation=63mW, Min Operating Temperature=-55°C, Package Quantity=1, Power Rating=62.5mW, Resistance Tolerance=1%, Resistor Type="Thick Film", Temperature Coefficient=100ppm/°C, Voltage Rating=50V, Case/Package=0402, ComponentLink1Description=https://datasheet.ciiva.com/46412/1018594-46412838.pdf?src-supplier=Element14, ComponentLink1URL=https://datasheet.ciiva.com/46412/1018594-46412838.pdf?src-supplier=Element14, ComponentLink2Description=https://datasheet.ciiva.com/2453/pyu-r-int-thick-7-2453377.pdf?src-supplier=Digikey, ComponentLink2URL=https://datasheet.ciiva.com/2453/pyu-r-int-thick-7-2453377.pdf?src-supplier=Digikey, ComponentLink3Description=https://datasheet.ciiva.com/2453/pyu-r-int-thick-7-2453378.pdf?src-supplier=Digikey, ComponentLink3URL=https://datasheet.ciiva.com/2453/pyu-r-int-thick-7-2453378.pdf?src-supplier=Digikey, ComponentLink4Description=https://datasheet.ciiva.com/2453/pyu-r-int-thick-7-2453376.pdf?src-supplier=Digikey, ComponentLink4URL=https://datasheet.ciiva.com/2453/pyu-r-int-thick-7-2453376.pdf?src-supplier=Digikey, ComponentLink5Description=https://datasheet.ciiva.com/7850/1018594-7850015.pdf?src-supplier=Element14, ComponentLink5URL=https://datasheet.ciiva.com/7850/1018594-7850015.pdf?src-supplier=Element14, ComponentLink6Description=https://datasheet.ciiva.com/7850/1018594-7850014.pdf?src-supplier=Element14, ComponentLink6URL=https://datasheet.ciiva.com/7850/1018594-7850014.pdf?src-supplier=Element14, ComponentLink7Description=https://datasheet.ciiva.com/15189/getdatasheetpartid-330246-15189463.pdf?src-supplier=Verical, ComponentLink7URL=https://datasheet.ciiva.com/15189/getdatasheetpartid-330246-15189463.pdf?src-supplier=Verical, Construction=Rectangular, Depth=0.5mm, Features="Moisture Resistant", Height=0.016inch, Item Type=Resistor, Lead Free="Lead Free", Length=1mm, Manufacturer Part Number=RC0402FR-07470RL, Military Standard=Not, Number of Terminations=2, Packaging="Tape and Reel", Pricing="10000=0.00085 (USD)", Reach SVHC Compliant=No, RoHS=Yes, RoHS Compliant=Yes, Series=RC, Stock=10000, Supplier=Avnet, Supplier Part Number=RC0402FR-07470RL, Termination=SMD/SMT, Tolerance=1%, Voltage Rating (AC)=50V, Width=0.02inch, Working Voltage=50V
R8 R14 R15: library part RC0402FR-07100RL, "100 Ohms ±1% 0.063W, 1/16W Chip Resistor 0402 (1005 Metric) Moisture Resistant Thick Film", Digikey Part Number=311-100LRDKR-ND, Manufacturer=YAGEO, Package=0402, ComponentLink1Description="Digikey Link", ComponentLink1URL=https://www.digikey.com/en/products/detail/yageo/RC0402FR-07100RL/726527, Item Type=Resistor, Manufacturer Part Number=RC0402FR-07100RL
R10: library part PE1206FRF470R2L, "RES 0.2 OHM 1% 1W 1206", Case/Package=340Case, LCSC Part Number=C723709, Manufacturer=Yageo, Temperature Coefficient=100ppm/°C, Item Type=Resistors, Manufacturer Part Number=PE1206FRF470R2L, Packaging=10Packaging, Pricing="1=0.63, 10=0.459, 25=0.368, 50=0.2732, 100=0.1927, 250=0.17164, 500=0.14714, 1000=0.1121 (USD)", RoHS=Yes, RoHS Compliant=Yes, Stock=7734, Supplier=Digikey
R11: library part RC0402FR-071KL, "1 kOhms ±1% 0.063W, 1/16W Chip Resistor 0402 (1005 Metric) Moisture Resistant Thick Film", Digikey Part Number=311-1.00KLRDKR-ND, Manufacturer=YAGEO, Package=0402, ComponentLink1Description="Digikey Link", ComponentLink1URL=https://www.digikey.com/en/products/detail/yageo/RC0402FR-071KL/726513, Item Type=Resistor, Manufacturer Part Number=RC0402FR-071KL
R16: library part RC1206FR-075R6L, "RES 5.6 OHM 1% 1/4W 1206", LCSC Part Number=C137246, Manufacturer=Yageo, Voltage Rating (AC)=200V, ComponentLink1Description=https://datasheet.ciiva.com/11808/0900766b80c6630a-11808968.pdf?src-supplier=Rs, ComponentLink1URL=https://datasheet.ciiva.com/11808/0900766b80c6630a-11808968.pdf?src-supplier=Rs, ComponentLink2Description=https://datasheet.ciiva.com/7857/444357-7857382.pdf?src-supplier=Element14, ComponentLink2URL=https://datasheet.ciiva.com/7857/444357-7857382.pdf?src-supplier=Element14, ComponentLink3Description=https://datasheet.ciiva.com/7857/444357-7857383.pdf?src-supplier=Element14, ComponentLink3URL=https://datasheet.ciiva.com/7857/444357-7857383.pdf?src-supplier=Element14, ComponentLink4Description=https://datasheet.ciiva.com/17422/pyu-rc1206-51-rohs-l-4-17422485.pdf?src-supplier=Future+Electronics, ComponentLink4URL=https://datasheet.ciiva.com/17422/pyu-rc1206-51-rohs-l-4-17422485.pdf?src-supplier=Future+Electronics, Item Type=Resistor, Manufacturer Part Number=RC1206FR-075R6L, Pricing="5000=0.0109, 25000=0.0104, 100000=0.0098, 250000=0.0095, 625000=0.009 (USD)", RoHS=Yes, Stock=50000, Supplier="Future Electronics"
R18 R19: library part RT0402BRD0710KL, "RES SMD 10K OHM 0.1% 1/16W 0402", LCSC Part Number=C190095, Manufacturer=Yageo, Supplier Part Number=1236728, Category="Chip SMD Resistors", ComponentLink1Description=https://datasheet.ciiva.com/12836/pyu-rt-1-to-0-05-rohs-l-4-12836454.pdf?src-supplier=Mouser, ComponentLink1URL=https://datasheet.ciiva.com/12836/pyu-rt-1-to-0-05-rohs-l-4-12836454.pdf?src-supplier=Mouser, Item Type=Resistor, Manufacturer Part Number=RT0402BRD0710KL, Pricing="10000=0.0218, 20000=0.0213, 30000=0.021, 50000=0.0206, 100000=0.0199 (USD)", RoHS=Yes, Stock=490000, Supplier="Future Electronics"
R21: library part RC0402FR-071KL, "RES 1K OHM 1% 1/16W 0402", Case Code (Imperial)=0402, Case Code (Metric)=1005, LCSC Part Number=C106235, Manufacturer=Yageo, Max Operating Temperature=155°C, Max Power Dissipation=63mW, Min Operating Temperature=-55°C, Power Rating=62.5mW, Resistance=1kR, Resistance Tolerance=1%, Resistor Type="Thick Film", Temperature Coefficient=100ppm/°C, Voltage Rating=50V, Case/Package=0402, Category="Chip SMD Resistors", ComponentLink1Description=https://datasheet.ciiva.com/11819/0900766b80c66297-11819477.pdf?src-supplier=RSComponents, ComponentLink1URL=https://datasheet.ciiva.com/11819/0900766b80c66297-11819477.pdf?src-supplier=RSComponents, ComponentLink2Description=https://datasheet.ciiva.com/7983/1018594-7983502.pdf?src-supplier=Element14, ComponentLink2URL=https://datasheet.ciiva.com/7983/1018594-7983502.pdf?src-supplier=Element14, ComponentLink3Description=https://datasheet.ciiva.com/22747/1018594-22747513.pdf?src-supplier=Element14, ComponentLink3URL=https://datasheet.ciiva.com/22747/1018594-22747513.pdf?src-supplier=Element14, ComponentLink4Description=https://datasheet.ciiva.com/12666/pyu-rc0402-51-rohs-l-6-r-12666741.pdf?src-supplier=Mouser, ComponentLink4URL=https://datasheet.ciiva.com/12666/pyu-rc0402-51-rohs-l-6-r-12666741.pdf?src-supplier=Mouser, ComponentLink5Description=https://datasheet.ciiva.com/7849/1018594-7849869.pdf?src-supplier=Element14, ComponentLink5URL=https://datasheet.ciiva.com/7849/1018594-7849869.pdf?src-supplier=Element14, ComponentLink6Description=https://datasheet.ciiva.com/7849/1018594-7849871.pdf?src-supplier=Element14, ComponentLink6URL=https://datasheet.ciiva.com/7849/1018594-7849871.pdf?src-supplier=Element14, ComponentLink7Description=https://datasheet.ciiva.com/17063/pyu-rc0402-51-rohs-l-6-r-17063193.pdf?src-supplier=Future+Electronics, ComponentLink7URL=https://datasheet.ciiva.com/17063/pyu-rc0402-51-rohs-l-6-r-17063193.pdf?src-supplier=Future+Electronics, Construction=Rectangular, Depth=0.5mm, Features="Moisture Resistant", Height=0.32mm, Item Type=Resistor, Lead Free="Lead Free", Length=1mm, Manufacturer Part Number=RC0402FR-071KL, Military Standard=Not, Number of Pins=2, Number of Terminations=2, Packaging="Tape and Reel", Pricing 1="10000=0.00085, 20000=0.00087, 40000=0.00084, 60000=0.00083, 80000=0.00079, 100000=0.00078, 1000000=0.00076 (USD)", Reach SVHC Compliant=Yes, RoHS=Yes, RoHS Compliant=Yes, Series=RC, Size Code=0402, Stock 1=13030000, Supplier 1=Avnet, Supplier Part Number 1=RC0402FR-071KL, Technology="THICK FILM", Termination=SMD/SMT, Tolerance=1%, Voltage Rating (DC)=50V, Width=0.5mm
R22 R23: library part RC0201FR-074K7L, "RES 4.7K OHM 1% 1/20W 0201", LCSC Part Number=C138135, Manufacturer=Yageo, Supplier Part Number=7537285, Category="Chip SMD Resistors", ComponentLink1Description=https://datasheet.ciiva.com/2493/pyu-r-int-thick-7-2493811.pdf?src-supplier=Digi-Key, ComponentLink1URL=https://datasheet.ciiva.com/2493/pyu-r-int-thick-7-2493811.pdf?src-supplier=Digi-Key, ComponentLink2Description=https://datasheet.ciiva.com/2493/pyu-r-int-thick-7-2493812.pdf?src-supplier=Digi-Key, ComponentLink2URL=https://datasheet.ciiva.com/2493/pyu-r-int-thick-7-2493812.pdf?src-supplier=Digi-Key, ComponentLink3Description=https://datasheet.ciiva.com/2493/pyu-r-int-thick-7-2493813.pdf?src-supplier=Digi-Key, ComponentLink3URL=https://datasheet.ciiva.com/2493/pyu-r-int-thick-7-2493813.pdf?src-supplier=Digi-Key, ComponentLink4Description=https://datasheet.ciiva.com/8892/pyu-rc0201-51-rohs-l-8-8892942.pdf?src-supplier=Avnet, ComponentLink4URL=https://datasheet.ciiva.com/8892/pyu-rc0201-51-rohs-l-8-8892942.pdf?src-supplier=Avnet, ComponentLink5Description=https://datasheet.ciiva.com/7672/1563626-7672233.pdf?src-supplier=Element14, ComponentLink5URL=https://datasheet.ciiva.com/7672/1563626-7672233.pdf?src-supplier=Element14, Item Type=Resistor, Manufacturer Part Number=RC0201FR-074K7L, Pricing="10000=0.0014, 50000=0.0013, 250000=0.0013, 750000=0.0012, 2000000=0.0011 (USD)", RoHS=Yes, Stock=1610000, Supplier="Future Electronics"
SW1: "No Gull Wing 50mA 100MO 80000 260gf@±50gf 12V -25?~+85? 1.7mm Golden Round Button Brick nogging SPST SMD Tactile Switches ROHS", LCSC Part Number=C2845290, Manufacturer=HCTL, ComponentLink1Description=LCSC, ComponentLink1URL=https://www.lcsc.com/product-detail/Tactile-Switches_HCTL-TC-0522C-1-7-260G_C2845290.html, Item Type=Switch, Manufacturer Part Number=TC-0522C-1.7-260G
U1: "4.5V~5.5V ???/Polymer 1 600mA SOT-23-5 Battery Management ICs ROHS", LCSC Part Number=C382138, Manufacturer=TPOWER, Package=SOT-23-5, ComponentLink1Description=LCSC, ComponentLink1URL=https://www.lcsc.com/product-detail/Battery-Management-ICs_TPOWER-TP4054_C382138.html, Item Type=IC, Manufacturer Part Number=TP4054
U2: "IC PB ON/OFF CONTROLLER TSOT23-8", Case/Package=TSOT, Input Capacitance=1.5nF, LCSC Part Number=C462677, Manufacturer="Analog Devices / Linear Technology", Max Operating Temperature=70°C, Max Supply Voltage=26.4V, Min Input Voltage=2.7V, Min Operating Temperature=0°C, Operating Supply Current=6uA, Package Quantity=2500, Threshold Voltage=600mV, ComponentLink1Description=https://datasheet.ciiva.com/1568/1605146-1568809.pdf?src-supplier=Farnell, ComponentLink1URL=https://datasheet.ciiva.com/1568/1605146-1568809.pdf?src-supplier=Farnell, ComponentLink2Description=https://datasheet.ciiva.com/1511/1605146-1511273.pdf?src-supplier=Element14, ComponentLink2URL=https://datasheet.ciiva.com/1511/1605146-1511273.pdf?src-supplier=Element14, ComponentLink3Description=https://datasheet.ciiva.com/1143/1605146-1143882.pdf?src-supplier=Farnell, ComponentLink3URL=https://datasheet.ciiva.com/1143/1605146-1143882.pdf?src-supplier=Farnell, ComponentLink4Description=https://datasheet.ciiva.com/1141/1605146-1141188.pdf?src-supplier=Element14, ComponentLink4URL=https://datasheet.ciiva.com/1141/1605146-1141188.pdf?src-supplier=Element14, ComponentLink5Description=https://datasheet.ciiva.com/25590/1605146-25590575.pdf?src-supplier=Newark, ComponentLink5URL=https://datasheet.ciiva.com/25590/1605146-25590575.pdf?src-supplier=Newark, ComponentLink6Description=https://datasheet.ciiva.com/1967/7377-1967610.pdf?src-supplier=Digikey, ComponentLink6URL=https://datasheet.ciiva.com/1967/7377-1967610.pdf?src-supplier=Digikey, Item Type=IC, Length=2.9mm, Manufacturer Part Number=LTC2950CTS8-1#TRPBF, Min Supply Voltage=2.7V, Packaging="Tape and Reel", Pins=8, Pricing="1=5.86, 10=4.98, 50=4.98, 100=4.31, 1000=3.1, 10000=2.81 (USD)", Reach SVHC Compliant=No, RoHS=Yes, RoHS Compliant=Yes, Stock=4, Supplier=Mouser, Supply Current=6uA
U3: "AVR tinyAVR™ 1, Functional Safety (FuSa) Microcontroller IC 8-Bit 20MHz 16KB (16K x 8) FLASH 20-VQFN (3x3)", Digikey Part Number=ATTINY1616-MNRDKR-ND, Manufacturer="Microchip Tech", Package=QFN-20-EP(3x3), ComponentLink1Description="Digikey Link", ComponentLink1URL=https://www.digikey.com/en/products/detail/microchip-technology/ATTINY1616-MNR/7354618?s=N4IgTCBcDaIIIBUEEkByBNAjANhwWgFlUAlEAXQF8g, Item Type=IC, Manufacturer Part Number=ATTINY1616-MNR
U4: "IC LED DRV RGLTR PWM 1.2A SC70-5", LCSC Part Number=C2928788, Manufacturer="Texas Instruments", Item Type=IC, Manufacturer Part Number=TPS92360DCKR, Pricing="1=0.91, 10=0.817, 25=0.7748, 100=0.6366, 250=0.59508, 500=0.52588, 1000=0.41517 (USD)", RoHS=No, Stock=4572, Supplier=Digikey
U5: "IC BATT MON LI-ION 1CELL 8TDFN", LCSC Part Number=C2682616, Manufacturer=Maxim, Max Operating Temperature=85°C, Min Operating Temperature=-20°C, Operating Supply Current=23uA, Operating Supply Voltage=4.5V, Output Voltage=400mV, Package Quantity=10000, Supplier Part Number 1=700-MAX17048G+T10, Category="Battery Management", ComponentLink1Description=https://datasheet.ciiva.com/14083/max17048-max17049-14083973.pdf?src-supplier=Digi-Key, ComponentLink1URL=https://datasheet.ciiva.com/14083/max17048-max17049-14083973.pdf?src-supplier=Digi-Key, Contact Plating=Tin,Matte, Item Type=IC, Manufacturer Part Number=MAX17048G+T10, Mount="Surface Mount", Number of Pins=8, Packaging="Tape and Reel", Pricing 1="1=3.34000, 10=3.00000, 50=2.84000, 100=2.46000, 1000=1.89000, 10000=1.83000 (USD)", Radiation Hardening=No, RoHS=Yes, RoHS Compliant=Yes, Series=ModelGauge™, Stock 1=41293, Supplier 1=Mouser
U6: "IC REG BUCK BST 3.3V 0.9A 10SON", LCSC Part Number=296-39461-1-ND, Manufacturer="Texas Instruments", ComponentLink1Description=https://datasheet.ciiva.com/2034/tps63030-2034702.pdf?src-supplier=Digikey, ComponentLink1URL=https://datasheet.ciiva.com/2034/tps63030-2034702.pdf?src-supplier=Digikey, ComponentLink2Description=https://datasheet.ciiva.com/3221/tps63030-3221513.pdf?src-supplier=Avnet, ComponentLink2URL=https://datasheet.ciiva.com/3221/tps63030-3221513.pdf?src-supplier=Avnet, Item Type=IC, Manufacturer Part Number=TPS63031DSKR, Pricing="1=2.06, 10=1.847, 25=1.7424, 100=1.4844, 250=1.3938, 500=1.21958, 1000=1.0105 (USD)", RoHS=Yes, Stock=6304, Supplier=Digikey
U7: "OPTOISOLATOR 3.75KV TRANS 4-SOP", LCSC Part Number=C81148, Manufacturer="Vishay Semiconductors", Voltage Rating (DC)=70V, ComponentLink1Description=https://datasheet.ciiva.com/11772/0900766b80e30939-11772485.pdf?src-supplier=Rs, ComponentLink1URL=https://datasheet.ciiva.com/11772/0900766b80e30939-11772485.pdf?src-supplier=Rs, ComponentLink2Description=https://datasheet.ciiva.com/27051/1107109-27051440.pdf?src-supplier=Jameco, ComponentLink2URL=https://datasheet.ciiva.com/27051/1107109-27051440.pdf?src-supplier=Jameco, ComponentLink3Description=https://datasheet.ciiva.com/8040/485045-8040879.pdf?src-supplier=Element14, ComponentLink3URL=https://datasheet.ciiva.com/8040/485045-8040879.pdf?src-supplier=Element14, ComponentLink4Description=https://datasheet.ciiva.com/14079/tcmt1100-14079945.pdf?src-supplier=Digikey, ComponentLink4URL=https://datasheet.ciiva.com/14079/tcmt1100-14079945.pdf?src-supplier=Digikey, ComponentLink5Description=https://datasheet.ciiva.com/14079/tcmt1100-14079946.pdf?src-supplier=Digikey, ComponentLink5URL=https://datasheet.ciiva.com/14079/tcmt1100-14079946.pdf?src-supplier=Digikey, ComponentLink6Description=https://datasheet.ciiva.com/8092/tcmt1100-8092285.pdf?src-supplier=Avnet, ComponentLink6URL=https://datasheet.ciiva.com/8092/tcmt1100-8092285.pdf?src-supplier=Avnet, ComponentLink7Description=https://datasheet.ciiva.com/12088/tcmt1100-103040-12088638.pdf?src-supplier=Mouser, ComponentLink7URL=https://datasheet.ciiva.com/12088/tcmt1100-103040-12088638.pdf?src-supplier=Mouser, Height=2.3mm, Item Type=Optocouplers, Lead Free=5697LeadFree, Manufacturer Part Number=TCMT1107, Pricing="1=0.6, 10=0.386, 50=0.386, 100=0.26, 1000=0.203, 10000=0.163 (USD)", RoHS=Yes, RoHS Compliant=5897YesNo, Stock=27846, Supplier=Mouser, Turn-Off Delay Time=4us, Turn-On Delay Time=1.5us

## Via types
v1: diameter 23.62, hole 11.81, Top Layer to Bottom Layer, tented both sides, 58 vias
v2: diameter 15.75, hole 7.87, Top Layer to Bottom Layer, tented both sides, 20 vias
v3: diameter 23.62, hole 11.81, Top Layer to Bottom Layer, 5 vias

## Nets (pads, with @x,y where several pads share a name; then routed paths per layer and width w, separated by ;. In a path a pad name is that pad's centre, name@x,y a point inside that pad or via, vN(x,y) a via of type N, cw(c..) or ccw(c..) an arc to the next point about the centre after c; other vN are vias at no path point)
25%: LED3.1 U3.5 | length 833.2
  Top Layer w8: U3.5 -161.05,1238.71 U3.5@-152.19,1238.71